# Altium PCB Interface-Board_v3.3.PcbDoc (part 2 of 3)
Units mil, origin at the board's own origin, x right, y up, seen from the top; angles counter-clockwise.
Board outline 1629.92 x 1653.54 mil, 4 copper layers (Top Layer, Power, Ground, Bottom Layer), stack 61.899 mil thick; 90 components, 56 nets, 294 pads, 167 vias.
Unrouted connection lines stored in the file: 1.
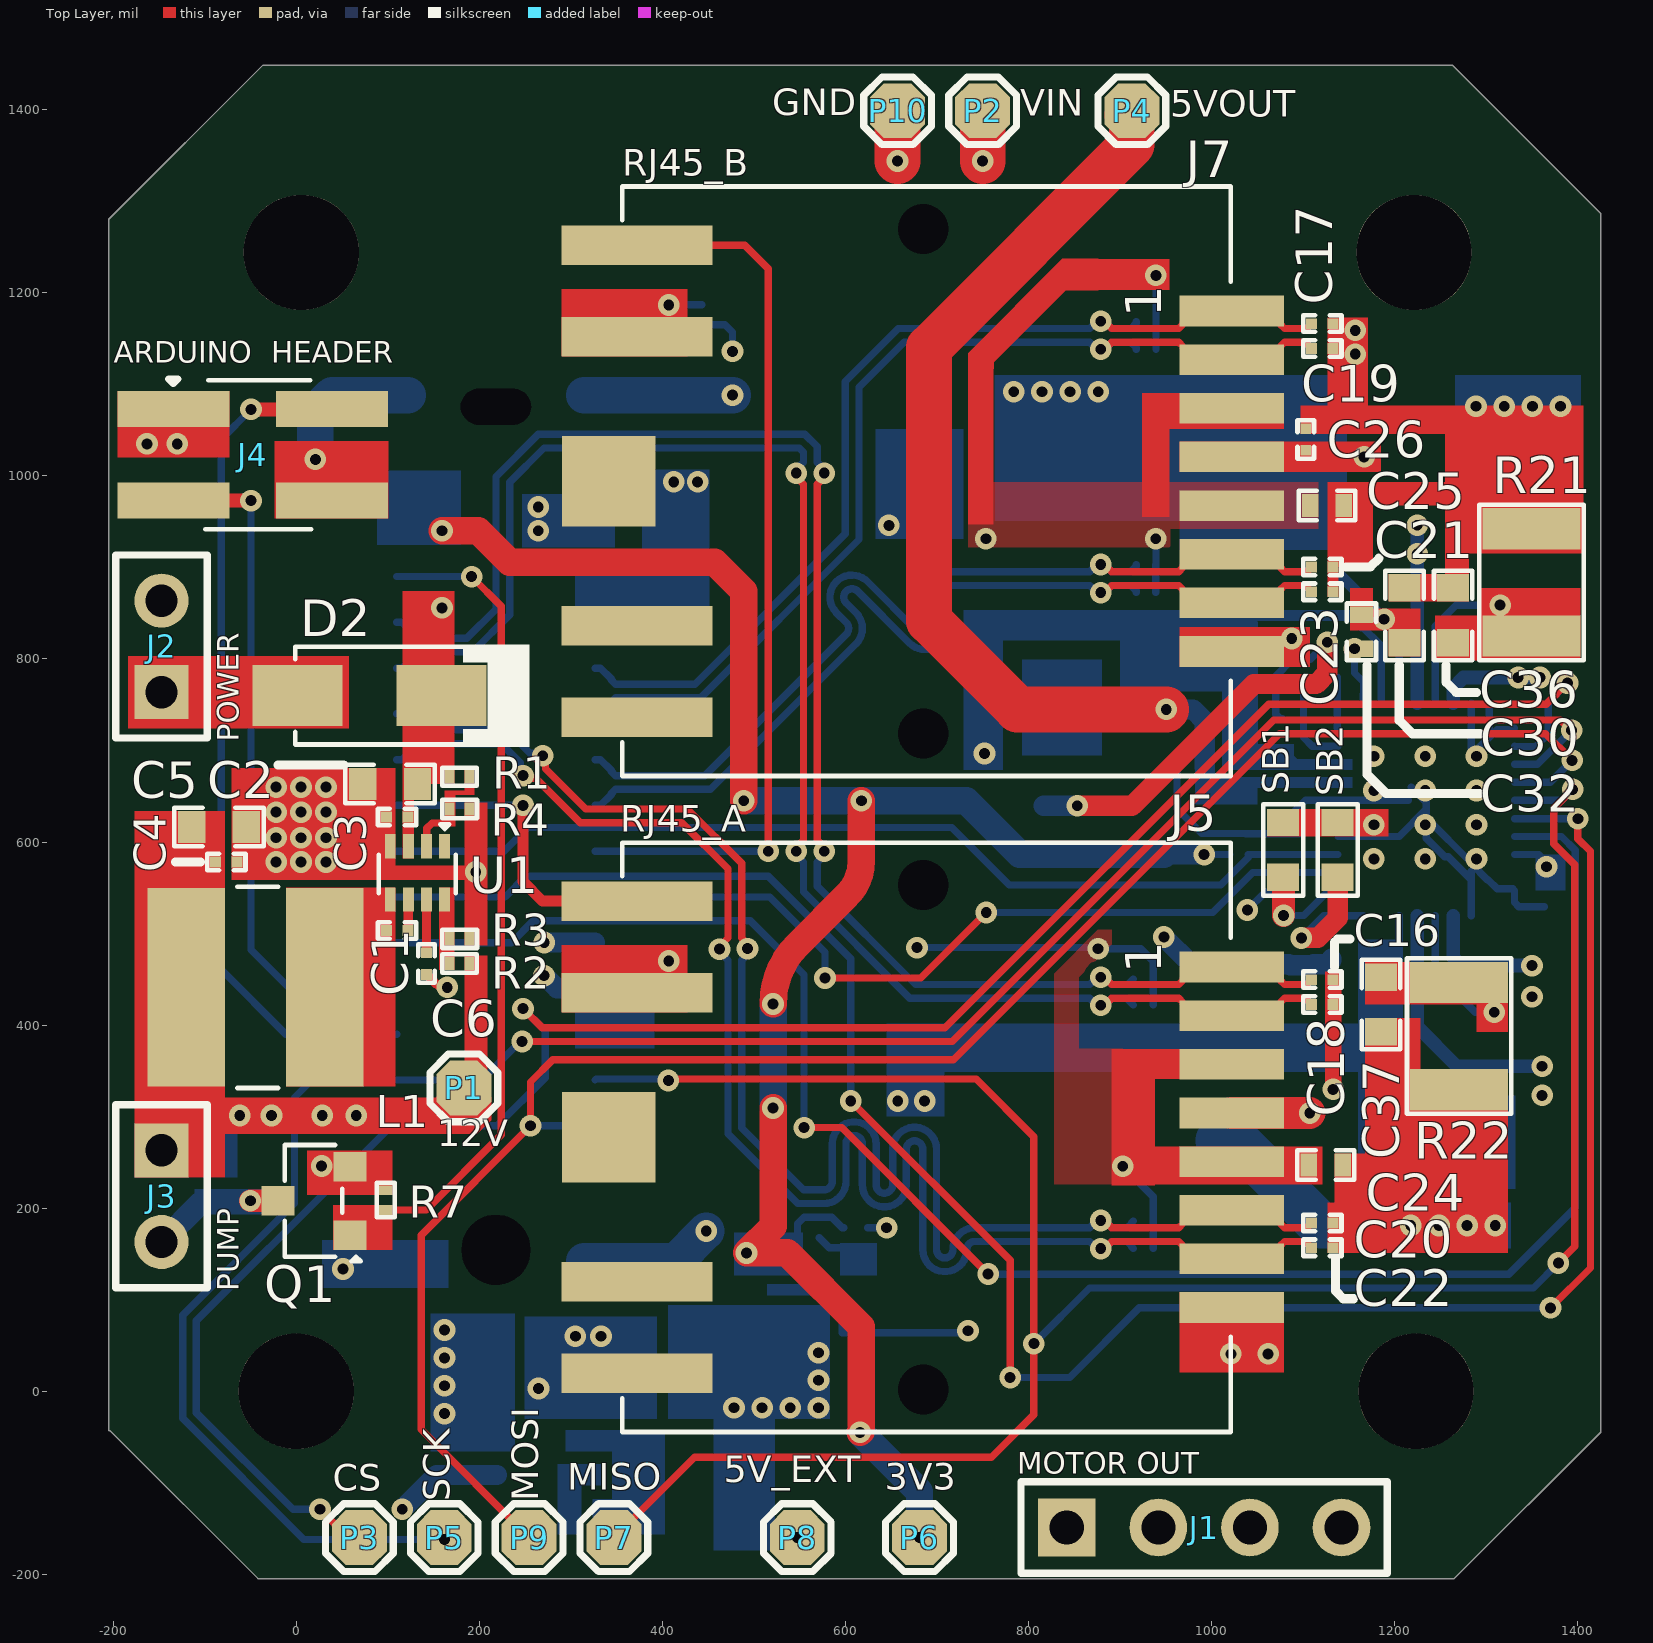
[diagram p0: Top Layer view]

## Part data (continued)
R5: library part 0201WMF9311TEE, "50mW Thick Film Resistors ±1% ±200ppm/℃ 9.31kΩ 0201 Chip Resistor - Surface Mount ROHS", LCSC Part Number=C423401, Manufacturer=UNI-ROYAL, Package=0201, ComponentLink1Description=LCSC, ComponentLink1URL=https://www.lcsc.com/product-detail/Chip-Resistor-Surface-Mount_UNI-ROYAL-Uniroyal-Elec-0201WMF9311TEE_C423401.html, Item Type=Resistor, Manufacturer Part Number=0201WMF9311TEE
R6: library part RC0201FR-073KL, "RES 3K OHM 1% 1/20W 0201", LCSC Part Number=C142016, Manufacturer=Yageo, Supplier Part Number=2837441, Category="Chip SMD Resistors", ComponentLink1Description=http://www.yageo.com/documents/recent/PYu-RC_Group_51_RoHS_L_9.pdf?src-supplier=Digi-Key, ComponentLink1URL=http://www.yageo.com/documents/recent/PYu-RC_Group_51_RoHS_L_9.pdf?src-supplier=Digi-Key, ComponentLink2Description=http://www.yageo.com/documents/recent/PYu-RC_Group_51_RoHS_L_10.pdf?src-supplier=Digi-Key, ComponentLink2URL=http://www.yageo.com/documents/recent/PYu-RC_Group_51_RoHS_L_10.pdf?src-supplier=Digi-Key, ComponentLink3Description=http://www.yageo.com.tw/exep/pages/download/literatures/PYu-R_INT-thick_7.pdf?src-supplier=Digi-Key, ComponentLink3URL=http://www.yageo.com.tw/exep/pages/download/literatures/PYu-R_INT-thick_7.pdf?src-supplier=Digi-Key, ComponentLink4Description=https://datasheet.octopart.com/RC0201FR-073KL-Yageo-datasheet-164759695.pdf?src-supplier=Future+Electronics, ComponentLink4URL=https://datasheet.octopart.com/RC0201FR-073KL-Yageo-datasheet-164759695.pdf?src-supplier=Future+Electronics, Item Type=Resistor, Manufacturer Part Number=RC0201FR-073KL, Pricing="10000=0.0013, 50000=0.0012, 250000=0.0012, 750000=0.0011, 2000000=0.001 (USD)", RoHS=Yes, Stock=10000, Supplier="Future Electronics"
R8 R9 R10 R11 R13 R14 R15 R16: library part RC0201FR-0749R9L, "RES SMD 49.9 OHM 1% 1/20W 0201", Case Code (Imperial)=0201, Case Code (Metric)=0603, LCSC Part Number=C155744, Manufacturer=Yageo, Max Operating Temperature=125°C, Max Power Dissipation=50mW, Min Operating Temperature=-55°C, Resistor Type="Thick Film", Temperature Coefficient=200ppm/°C, Tolerance=1%, Voltage Rating=25V, Case/Package=0201, Category="Chip SMD Resistors", ComponentLink1Description=http://www.yageo.com/documents/recent/PYu-RC0201_51_RoHS_L_(8).pdf?src-supplier=Mouser, ComponentLink1URL=http://www.yageo.com/documents/recent/PYu-RC0201_51_RoHS_L_(8).pdf?src-supplier=Mouser, ComponentLink2Description=http://www.yageo.com/documents/recent/PYu-RC0201_51_RoHS_L_(8).pdf?src-supplier=Future+Electronics, ComponentLink2URL=http://www.yageo.com/documents/recent/PYu-RC0201_51_RoHS_L_(8).pdf?src-supplier=Future+Electronics, ComponentLink3Description=http://www.yageo.com/documents/recent/PYu-RC_Group_51_RoHS_L_10.pdf?src-supplier=Digi-Key, ComponentLink3URL=http://www.yageo.com/documents/recent/PYu-RC_Group_51_RoHS_L_10.pdf?src-supplier=Digi-Key, ComponentLink4Description=http://www.yageo.com/documents/recent/PYu-RC_Group_51_RoHS_L_9.pdf?src-supplier=Digi-Key, ComponentLink4URL=http://www.yageo.com/documents/recent/PYu-RC_Group_51_RoHS_L_9.pdf?src-supplier=Digi-Key, Construction=Rectangular, Depth=0.3mm, Features="Moisture Resistant", Height=0.01inch, Item Type=Resistor, Lead Free="Lead Free", Length=0.6mm, Manufacturer Part Number=RC0201FR-0749R9L, Military Standard=Not, Number of Terminations=2, Packaging="Tape and Reel", Power Rating=50mW, Pricing 1="10000=0.00128 (USD)", Resistance=49.9R, RoHS=Yes, RoHS Compliant=Yes, Series=RC, Size Code=0201, Stock 1=1020000, Supplier 1=Avnet, Supplier Part Number 1=RC0201FR-0749R9L, Termination=SMD/SMT, Width=0.012inch
R12 R17: library part RC0201DR-07330RL, "RES 330 OHM 0.5% 1/20W 0201", Case/Package=0201, LCSC Part Number=C851717, Manufacturer=Yageo, Max Operating Temperature=125°C, Max Power Dissipation=50mW, Min Operating Temperature=-55°C, Supplier Part Number 1=RC0201DR-07330RL-ND, Temperature Coefficient=200ppm/°C, Tolerance=0.5%, Category="Chip SMD Resistors", ComponentLink1Description=http://www.yageo.com.tw/exep/pages/download/literatures/PYu-R_INT-thick_7.pdf?src-supplier=Digi-Key, ComponentLink1URL=http://www.yageo.com.tw/exep/pages/download/literatures/PYu-R_INT-thick_7.pdf?src-supplier=Digi-Key, Features="Moisture Resistant", Height=0.01inch, Item Type=Resistor, Length=0.024inch, Manufacturer Part Number=RC0201DR-07330RL, Number of Terminations=2, Packaging="Tape and Reel", Pricing 1="10000=0.02267 (USD)", RoHS=Yes, RoHS Compliant=Yes, Series=RC, Supplier 1=Digi-Key, Width=0.012inch
R18: library part RC0603FR-0710RL, "RES SMD 10 OHM 1% 1/10W 0603", Case Code (Imperial)=0603, Case Code (Metric)=1608, LCSC Part Number=C109318, Manufacturer=Yageo, Max Operating Temperature=155°C, Min Operating Temperature=-55°C, Power Rating=100mW, Supplier Part Number 1=311-10.0HRDKR-ND, Temperature Coefficient=200ppm/°C, Tolerance=1%, Voltage Rating=50V, Case/Package=0603, ComponentLink1Description=http://www.farnell.com/datasheets/1868787.pdf?src-supplier=Element14, ComponentLink1URL=http://www.farnell.com/datasheets/1868787.pdf?src-supplier=Element14, ComponentLink2Description=http://www.yageo.com/documents/recent/PYu-RC0603_51_RoHS_L_4.pdf?src-supplier=Avnet, ComponentLink2URL=http://www.yageo.com/documents/recent/PYu-RC0603_51_RoHS_L_4.pdf?src-supplier=Avnet, ComponentLink3Description=http://documents.rs-components.com/techlib://itc_doclist_GB.htm?stockno=5048984&src-supplier=RSComponents, ComponentLink3URL=http://documents.rs-components.com/techlib://itc_doclist_GB.htm?stockno=5048984&src-supplier=RSComponents, ComponentLink4Description=http://www.yageo.com/documents/recent/PYu-RC0603_51_RoHS_L_4.pdf?src-supplier=Avnet+Europe, ComponentLink4URL=http://www.yageo.com/documents/recent/PYu-RC0603_51_RoHS_L_4.pdf?src-supplier=Avnet+Europe, Composition="Thick Film", Contact Plating=Tin,Matte, Depth=0.8mm, Height=0.45mm, Item Type=Resistor, Lead Free="Lead Free", Length=1.6mm, Manufacturer Part Number=RC0603FR-0710RL, Military Standard=Not, Number of Pins=2, Packaging="Tape and Reel", Pricing 1="1=0.1, 10=0.046, 100=0.0187, 1000=0.0084, 2500=0.00729 (USD)", Radiation Hardening=No, REACH SVHC="No SVHC", Resistance=10R, Stock 1=10836596, Supplier 1=Digi-Key, Termination=SMD/SMT, Voltage Rating (DC)=50V, Width=0.8mm
R21 R22: library part FRL1210JR110TS, "500mW ±5% 110mΩ 1210 Chip Resistor - Surface Mount ROHS", LCSC Part Number=C3000678, Manufacturer=FOJAN, Package=1210, ComponentLink1Description=LCSC, ComponentLink1URL=https://www.lcsc.com/product-detail/Chip-Resistor-Surface-Mount_RALEC-RTT1214R0FTP_C333127.html, Item Type=Resistor, Manufacturer Part Number=FRL1210JR110TS
R23: library part RC0603FR-0720KL, "RES 20K OHM 1% 1/10W 0603", Case Code (Imperial)=0603, Case Code (Metric)=1608, LCSC Part Number=C105575, Manufacturer=Yageo, Max Operating Temperature=155°C, Max Power Dissipation=100mW, Min Operating Temperature=-55°C, Package Quantity=1, Resistance=20kR, Resistance Tolerance=1%, Resistor Type="Thick Film", Temperature Coefficient=100ppm/°C, Voltage Rating=50V, Case/Package=0603, Category="Chip SMD Resistors", ComponentLink1Description=https://datasheet.ciiva.com/11808/0900766b80f96399-11808275.pdf?src-supplier=RSComponents, ComponentLink1URL=https://datasheet.ciiva.com/11808/0900766b80f96399-11808275.pdf?src-supplier=RSComponents, ComponentLink2Description=https://datasheet.ciiva.com/22747/443971-22747525.pdf?src-supplier=Element14, ComponentLink2URL=https://datasheet.ciiva.com/22747/443971-22747525.pdf?src-supplier=Element14, ComponentLink3Description=https://datasheet.ciiva.com/2453/pyu-r-int-thick-7-2453911.pdf?src-supplier=Digi-Key, ComponentLink3URL=https://datasheet.ciiva.com/2453/pyu-r-int-thick-7-2453911.pdf?src-supplier=Digi-Key, ComponentLink4Description=https://datasheet.ciiva.com/2453/pyu-r-int-thick-7-2453912.pdf?src-supplier=Digi-Key, ComponentLink4URL=https://datasheet.ciiva.com/2453/pyu-r-int-thick-7-2453912.pdf?src-supplier=Digi-Key, ComponentLink5Description=https://datasheet.ciiva.com/2453/pyu-r-int-thick-7-2453910.pdf?src-supplier=Digi-Key, ComponentLink5URL=https://datasheet.ciiva.com/2453/pyu-r-int-thick-7-2453910.pdf?src-supplier=Digi-Key, Construction=Rectangular, Depth=0.8mm, Features="Moisture Resistant", Height=0.022inch, Item Type=Resistor, Lead Free="Lead Free", Length=0.063inch, Manufacturer Part Number=RC0603FR-0720KL, Military Standard=Not, Number of Pins=2, Number of Terminations=2, Packaging="Tape and Reel", Power Rating=100mW, Pricing 1="5000=0.00240, 10000=0.00220, 25000=0.00200, 50000=0.00190, 125000=0.00180 (USD)", REACH SVHC="No SVHC", RoHS=Yes, RoHS Compliant=Yes, Series=RC, Size Code=0603, Stock 1=945000, Supplier 1="Arrow Electronics", Supplier Part Number 1=RC0603FR-0720KL, Technology="THICK FILM", Termination=SMD/SMT, Tolerance=1%, Voltage Rating (DC)=50V, Width=0.031inch
R24: library part VG039NCHXTB203, "±25% 20kΩ SMD Variable Resistors/Potentiometers ROHS", LCSC Part Number=C128550, Manufacturer="HDK(Hokuriku Elec Industry)", Package=SMD, ComponentLink1Description=LCSC, ComponentLink1URL=https://www.lcsc.com/product-detail/Variable-Resistors-Potentiometers_HDK-Hokuriku-Elec-Industry-VG039NCHXTB203_C128550.html, Item Type=Potentiometer, Manufacturer Part Number=VG039NCHXTB203
SB1 SB2: "Solder Bridge ON"
U1: "IC REG BUCK ADJ 3A SOT583", LCSC Part Number=C3200405, Manufacturer="Texas Instruments", Supplier Part Number=595-TPS62933DRLR, Category="Voltage Regulators - Switching", Item Type=IC, Manufacturer Part Number=TPS62933DRLR, Pricing="1=0.7, 10=0.581, 50=0.581, 100=0.44, 1000=0.297, 10000=0.241 (USD)", RoHS=No, Stock=5259, Supplier=Mouser
U2: "IC REG LINEAR 3.3V 1A 8XDFN", Dropout Voltage=95mV, LCSC Part Number=C603677, Manufacturer="ON Semiconductor", Max Operating Temperature=125°C, Max Supply Voltage=5.5V, Min Current Limit=1.1A, Min Operating Temperature=-40°C, Min Output Voltage=3.3V, Output Current=1A, Power Supply Rejection Ratio (PSRR)=75dB, Quiescent Current=140uA, Supplier Part Number=NCP186BMX330TAGOSCT-ND, Category="Voltage Regulators - Linear", ComponentLink1Description=http://www.mouser.com/ds/2/308/NCP186-D-968152.pdf?src-supplier=Mouser, ComponentLink1URL=http://www.mouser.com/ds/2/308/NCP186-D-968152.pdf?src-supplier=Mouser, ComponentLink2Description=http://www.onsemi.com/pub/Collateral/NCP186-D.PDF?src-supplier=Digi-Key, ComponentLink2URL=http://www.onsemi.com/pub/Collateral/NCP186-D.PDF?src-supplier=Digi-Key, Item Type=IC, Lead Free="Lead Free", Manufacturer Part Number=NCP186BMX330TAG, Mounting Technology="Surface Mount", Number of Regulators=1, Output Configuration=Positive, Output Type=Fixed, Output Voltage=3.3V, Packaging="Tape and Reel", Pricing="1=0.49, 10=0.421, 25=0.3928, 100=0.2917, 250=0.24688, 500=0.23564, 1000=0.17393, 2500=0.1627 (USD)", RoHS=Yes, RoHS Compliant=Yes, Series=-, Stock=9, Supplier=Digi-Key
U3: "IC REG BUCK 5V 2A TSOT26", LCSC Part Number=C2071056, Manufacturer=Diodes, Supplier Part Number 1=AP63205WU-7DICT-ND, Category="Voltage Regulators - Switching", Item Type=IC, Manufacturer Part Number=AP63205WU-7, Pricing 1="1=0.88, 10=0.776, 25=0.7292, 100=0.5952, 250=0.55284, 500=0.4705, 1000=0.3764 (USD)", RoHS=Yes, Stock 1=88525, Supplier 1=Digi-Key
U4: "IC STEPPER MOTOR DVR SPI 36QFN", Case/Package=QFN, Manufacturer=Trinamic, Max Operating Temperature=125°C, Min Operating Temperature=-40°C, Output Current=1.4A, Supplier Part Number 1=700-TMC2130-LA-T, Category="Motor Drivers", ComponentLink1Description=https://www.trinamic.com/fileadmin/assets/Products/ICs_Documents/TMC2130_datasheet.pdf?src-supplier=Digi-Key, ComponentLink1URL=https://www.trinamic.com/fileadmin/assets/Products/ICs_Documents/TMC2130_datasheet.pdf?src-supplier=Digi-Key, Interface=SPI, Logic Function="AND GATE", Manufacturer Part Number=TMC2130-LA-T, Mount="Surface Mount", Packaging="Tape and Reel", Pricing 1="1=5.61000, 10=4.76000, 50=4.76000, 100=4.01000, 250=3.70000, 500=3.45000, 1000=2.90000, 2000=2.83000, 10000=2.83000 (USD)", RoHS=Yes, Stock 1=19660, Supplier 1=Mouser

## Free pads (board coordinates)
  round 125.98 hole 125.98 mask+1.97: MH(0,0) MH(5.62,1244.09) MH(1221.29,1244.09) MH(1223.46,0)

## Via types
v1: diameter 23.62, hole 11.81, Top Layer to Bottom Layer, tented both sides, 135 vias
v2: diameter 23.62, hole 11.81, Top Layer to Bottom Layer, 32 vias

## Nets (pads, with @x,y where several pads share a name; then routed paths per layer and width w, separated by ;. In a path a pad name is that pad's centre, name@x,y a point inside that pad or via, vN(x,y) a via of type N, cw(c..) or ccw(c..) an arc to the next point about the centre after c; other vN are vias at no path point)
5V_EXT: C9.2 C13.1 C14.2 C15.2 C27.2 L2.2 P8.1 R18.2 R23.2 U2.6 U2.7 U2.8 U3.1 U4.26 U4.30 | length 617.4
  Bottom Layer w8: 932.98,782 972.38,782 1024.19,833.81 ; 1024.19,840.52 1046.37,840.52 ; 1163.73,836.03 1185.38,814.38 U4.30@1185.38,751.77
  Bottom Layer w12: 1046.59,847.7 1152.06,847.7 1163.73,836.03
  Bottom Layer w22: v1(116,-129) 153.6,-91.4 U3.1@219.54,-91.4 ; 475.22,39.77 542.87,39.77 v2(570.64,12) 554.46,12
  Bottom Layer w25: 522.3,-160 v2(547.46,-160)
  other v1: 752,696.68
  other v2: 478.29,-18 509.07,-18 539.86,-18 570.64,-18 570.64,42
5VOUT: C35.1 P4.1 R18.1 U4.25 | length 1052.6
  Top Layer w50: P4.1@908.36,1394.26 P4.1@913,1398.9 913,1361.73 691.42,1140.15 691.42,841.58 788.12,744.88 v1(950.61,744.88)
  Bottom Layer w22: v1(950.61,744.88) 979.77,744.88 992.65,731.99 992.65,681.73
#UART_RX: J4.2 J6.B13 | length 938.3
  Top Layer w8: J4.2@36.82,1072.59 J4.2@37.23,1073
  Top Layer w15: v1(-49.39,1072.59) J4.2@36.82,1072.59
  Bottom Layer w8: v1@-45.95,1076.03 v1(-49.39,1072.59) -82,1039.98 -82,460.79 -11.21,390 J6.B13@110,390
#UART_TX: J4.3 J6.B12 | length 754.2
  Top Layer w15: J4.3@-136,973 v1(-49.39,973)
  Bottom Layer w8: v1(-49.39,973) -49.39,482.39 -7,440 J6.B12@110,440
CS: J6.B15 P3.1 U4.2 | length 2324.5
  Top Layer w8: v1(26,-129) 57,-160 P3.1@69,-160 ; v1(247.84,418) 268.84,397 708.88,397 1062.44,750.56 1365.8,750.56 v1(1389,773.76)
  Bottom Layer w8: v1(26,-129) -3.53,-129 -109,-23.53 -109,76.91 51.21,237.12 104.09,290 219.5,290 272,342.5 272,393.84 v1(247.84,418) ; U4.2@1331.05,704.52 1331.33,704.25 1353.95,704.25 1368.02,718.32 1368.02,752.78 v1(1389,773.76)
DIAG0: J6.A10 R20.1 U4.20 | length 912.7
  Top Layer w8: v1(577.7,451.37) 682.37,451.37 v1(754,523)
  Bottom Layer w8: J6.A10@326.54,540 517.36,540 577.7,479.66 v1(577.7,451.37) ; v1(754,523) 1001.38,523 1045.11,566.73 R20.1@1083.23,566.73 U4.20@1138.14,566.73
DIAG1: J6.B9 R19.1 U4.21 | length 1077.4
  Bottom Layer w8: J6.B9@110,590 227,590 252.88,615.88 716.08,615.88 778.96,553 1010.16,553 R19.1@1040.29,583.13 ; R19.1@1040.29,586.41 R19.1@1041.61,586.41 U4.21@1138.14,586.41
DIR: J6.B11 U4.7 | length 2047
  Top Layer w8: v1(554.89,288) 596,288 v1@755,129
  Bottom Layer w8: J6.B11@110,490 235.25,490 259.06,513.81 496.07,513.81 554.89,454.99 v1(554.89,288) ; v1(756,128) 756.2,127.8 1324.8,127.8 1397.56,200.56 1397.56,590.97 1382.43,606.1 U4.7@1331.05,606.1